# Altium PCB Buck_converter.PcbDoc
Units mil, origin at the board's own origin, x right, y up, seen from the top; angles counter-clockwise.
Board outline 1929.13 x 787.4 mil, 2 copper layers (Top Layer, Bottom Layer); 6 components, 4 nets, 13 pads, 0 vias.
Unrouted connection lines stored in the file: 4.
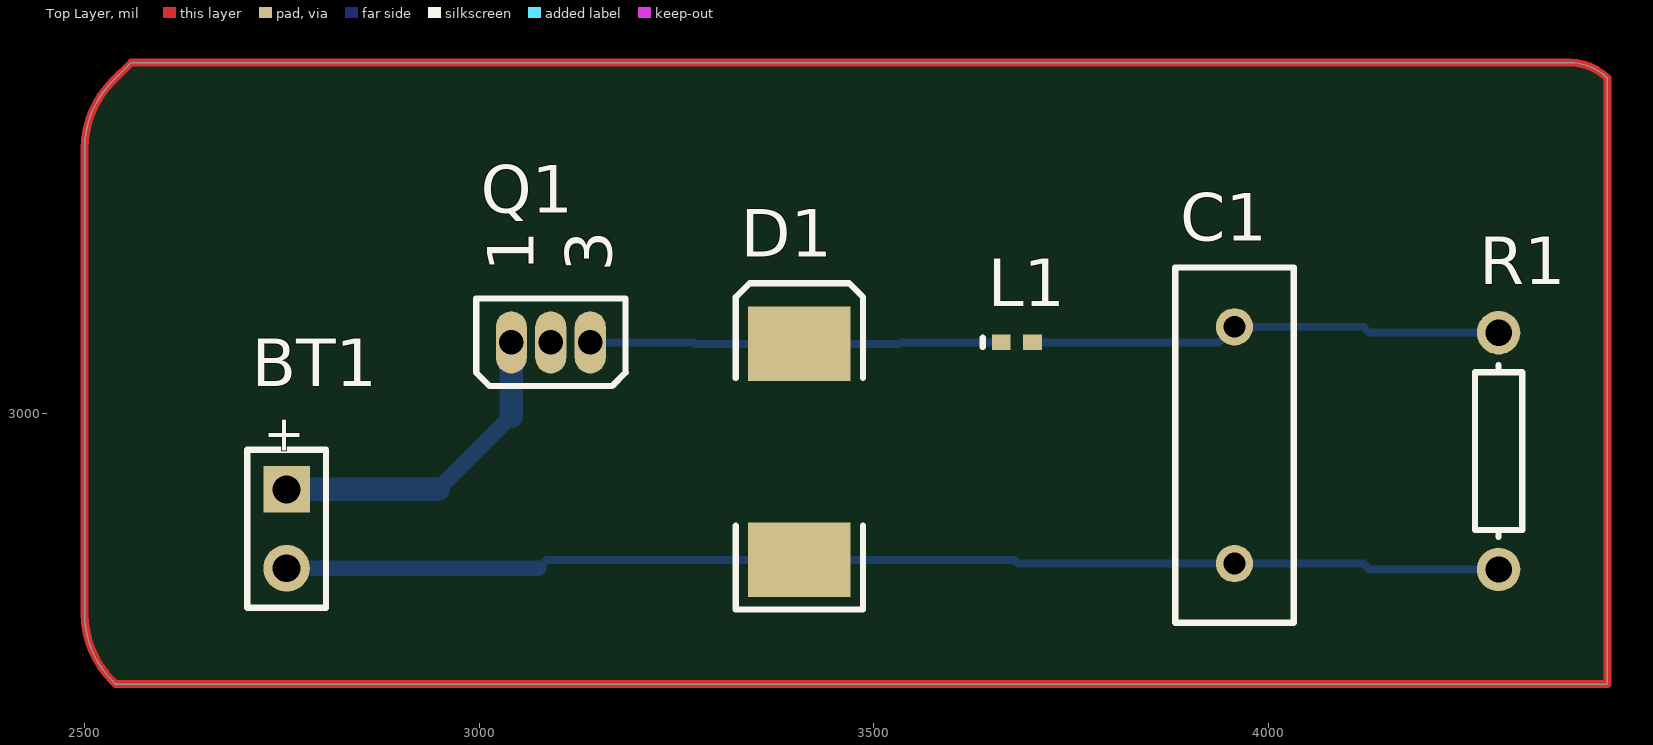
[diagram p0: Top Layer view]
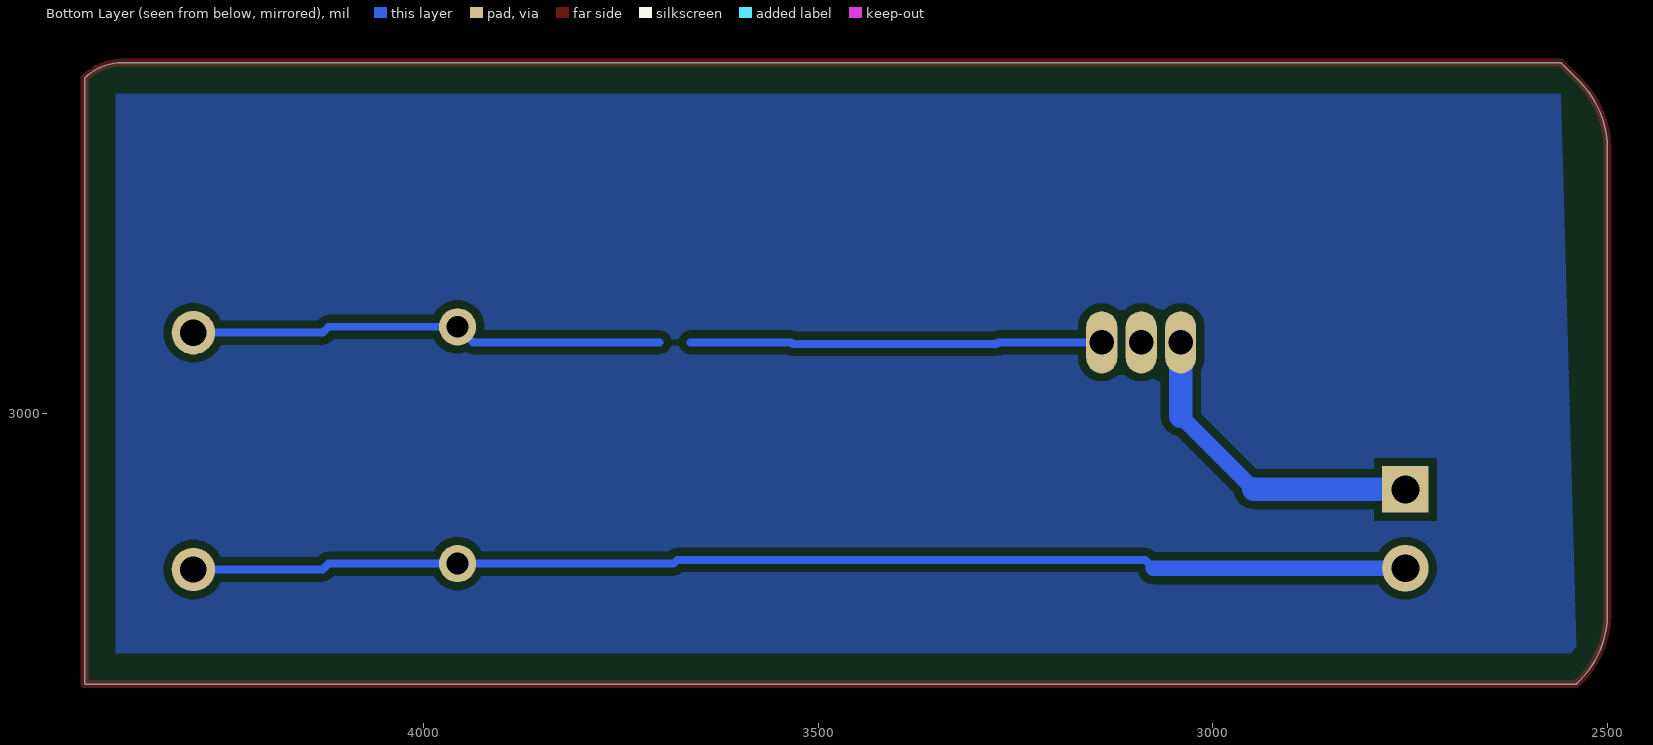
[diagram p1: Bottom Layer view, seen from below]

## Layer stack, top to bottom
Top Solder: solder mask 0.4, Solder Resist, Dk 3.5
Top Layer: signal copper 1.4
Dielectric 1: dielectric 12.6, FR-4, Dk 4.8
Bottom Layer: signal copper 1.4
Bottom Solder: solder mask 0.4, Solder Resist, Dk 3.5

## Board outline
2500,2746.85 2500,3335.83 cw(c2620.71,3335.83) 2535.36,3421.18 2559.06,3444.88 4381.61,3444.88 cw(c4381.61,3377.67) 4429.13,3425.2 4429.13,2657.48 2539.37,2657.48 2535.36,2661.5 cw(c2620.71,2746.85)

## Design rules (kind name [scope] priority, off if disabled: settings)
Clearance [All] p1: gap=10 ignorepadtopadclearanceinfootprint=FALSE
PolygonConnect [All] p1: connectstyle=Relief reliefconductorwidth=10 reliefentries=4 polygonreliefangle="90 Angle" airgapwidth=10
RoutingVias [All] p1: holewidth=28 width=50 viastyle="Through Hole" minholewidth=28 minwidth=50 maxholewidth=28 maxwidth=50
SolderMaskExpansion [All] p1: expansion=4 istentingtop=FALSE
Width [All] p1: maxlimit=10 minlimit=10 preferedwidth=10
30 further rules are at their usual default settings.

## Classes and differential pairs
component class Buck_Converter: BT1 C1 L1 Q1 R1

## Components (designator, comment, footprint, x,y, rotation, side; value= is the part's Value field where it differs from the comment)
BT1 "Battery" BAT-2 2755.91,2854.33 r270 top
C1 "Cap" RAD-0.3 3956.69,2960.24 r90 top value=100pF
D1 "Diode" SMC 3405.51,2951.77 r90 top
L1 "Inductor" 0402-A 3681.1,3090.55 r0 top value=10mH
Q1 "MOSFET-N" E3 3090.55,3090.55 r90 top
R1 "Res1" AXIAL-0.3 4291.34,2952.76 r90 top value=1K

## Footprints (in the part's own frame and the unit in brackets; to place one, negate y for a bottom-side part, rotate by r counter-clockwise, add the part's x,y. Pads: shape width x height; smd on the part's side, far side on the other; paste and mask are expansions set on the pad)
0402-A [mm] "Chip Inductor, Body 1.0x0.5mm, IPC High Density"
  rect 0.6x0.5 smd: 1(-0.5,0) 2(0.5,0)
  silkscreen extent -1.1,-0.15 -1.1,0.15, body extent -0.55,-0.3 0.55,0.3, height 0.55
AXIAL-0.3 [mm] "Axial Device, Thru-Hole; 2 Leads; 0.3 in Pin Spacing"
  round 1.4 hole 0.85: 1(-3.81,0) 2(3.81,0)
  silkscreen extent -2.77,-0.76 2.77,0.76
BAT-2 [mm] "Battery; 2 Leads"
  rect 1.5x1.5 hole 0.9: 1(-1.27,0)
  round 1.5 hole 0.9: 2(1.27,0)
  silkscreen extent -2.54,-1.27 2.54,1.27
E3 [mm] "TO, Flat Index; 3 In-Line, Axial Leads; Body Dia. 4.6mm; Lead Dia. 0.5 mm (max)"
  oval 2x1 hole 0.8: 1(0,1.27) 2(0,0) 3(0,-1.27)
  silkscreen extent -1.41,-2.41 1.41,2.41
RAD-0.3 [mm] "Radial Cap, Thru-Hole; 2 Leads; 0.3 in Pin Spacing"
  round 1.2 hole 0.7: 1(-3.81,0) 2(3.81,0)
  silkscreen extent -5.72,-1.9 5.71,1.91
SMC [mm] "DO-214-AB/SMC; 2 C-Bend Leads; Body 7.9 x 5.9 mm, inc. leads (LxW)"
  rect 2.4x3.3 smd: 1(-3.475,0) 2(3.475,0)
  silkscreen extent -5.08,-2.05 5.42,2.06

## Part data
BT1: "Multicell Battery", LatestRevisionDate=17-Jul-2002, LatestRevisionNote="Re-released for DXP Platform.", PackageDescription="Battery; 2 Leads", PackageReference=BAT-2, Published=24-Mar-1999, Publisher="Altium Limited"
C1: "Capacitor", LatestRevisionDate=17-Jul-2002, LatestRevisionNote="Re-released for DXP Platform.", PackageDescription="Radial Cap, Thru-Hole; 2 Leads; 0.3 in Pin Spacing", PackageReference=RAD-0.3, Published=8-Jun-2000, Publisher="Altium Limited"
D1: "Default Diode", Code_JEDEC=DO-214-AB, LatestRevisionDate=17-Jul-2002, LatestRevisionNote="Re-released for DXP Platform.", PackageDescription="DO-214-AB/SMC; 2 C-Bend Leads; Body 7.9 x 5.9 mm, inc. leads (LxW)", PackageReference=SMC, PackageVersion=Sep-1996, Published=8-Jun-2000, Publisher="Altium Limited"
Q1: "N-Channel MOSFET", LatestRevisionDate=17-Jul-2002, LatestRevisionNote="Re-released for DXP Platform.", PackageDescription="TO, Flat Index; 3 In-Line, Axial Leads; Body Dia. 4.6mm; Lead Dia. 0.5 mm (max)", PackageReference=E3, PackageVersion=1995/1996, Published=8-Jun-2000, Publisher="Altium Limited"
R1: "Resistor", LatestRevisionDate=17-Jul-2002, LatestRevisionNote="Re-released for DXP Platform.", PackageDescription="Axial Device, Thru-Hole; 2 Leads; 0.3 in Pin Spacing", PackageReference=AXIAL-0.3, Published=8-Jun-2000, Publisher="Altium Limited"
L1: Code_IEC=1005, Code_JEITA=0402, LatestRevisionDate=29-May-2009, LatestRevisionNote="IPC-7351 Footprint Added.", PackageDescription="Chip Inductor", PackageReference=0402-A, Published=8-Jun-2000, Publisher="Altium Limited"

## Nets (pads, with @x,y where several pads share a name; then routed paths per layer and width w, separated by ;. In a path a pad name is that pad's centre, name@x,y a point inside that pad or via, vN(x,y) a via of type N, cw(c..) or ccw(c..) an arc to the next point about the centre after c; other vN are vias at no path point)
NetBT1_1: BT1.1 Q1.1 | length 416.6
  Bottom Layer w20: 2947.88,2904.33 3040.55,2997
  Bottom Layer w30: BT1.1 2947.88,2904.33 ; 3040.55,2997 Q1.1
NetBT1_2: BT1.2 C1.1 D1.1 R1.1 | length 1544.9
  Bottom Layer w10: 3075,2804.33 3085.63,2814.96 3405.51,2814.96 3678,2814.96 3682.72,2810.24 C1.1 4120,2810.24 4127.48,2802.76 R1.1
  Bottom Layer w20: BT1.2 3075,2804.33
NetC1_2: C1.2 L1.2 R1.2 | length 601.8
  Bottom Layer w10: 3700.79,3090.55 3937.01,3090.55 C1.2 4120,3110.24 4127.48,3102.76 R1.2
NetD1_2: D1.2 L1.1 Q1.3 | length 522.5
  Bottom Layer w10: Q1.3 3272,3090.55 3273.97,3088.58 3405.51,3088.58 3532,3088.58 3533.97,3090.55 3661.42,3090.55
pads on no net: Q1.2
copper on no net: | length 5350.6
  Top Layer w10: 2500,2746.85 ccw(c2620.71,2746.85) 2535.36,2661.5 2539.37,2657.48 4429.13,2657.48 4429.13,3425.2 ccw(c4381.61,3377.67) 4381.61,3444.88 2559.06,3444.88 2535.36,3421.18 ccw(c2620.71,3335.83) 2500,3335.83 2500,2746.85

## Polygon pours and split planes (outlines as drawn)
no net on Bottom Layer "NONET_L02_P001" (solid, pour order 1): 2559.06,3405.51 4389.76,3405.51 4389.76,2696.85 2539.37,2696.85

## Text inside footprints (layer, text, board x,y; h text height)
BT1: Top Overlay "+" at 2733.19,2998.82 h45.28 r270
Q1: Top Overlay "1" at 3068.7,3180.12 h59.05 r90; Top Overlay "3" at 3167.84,3180.12 h59.05 r90